# Altium PCB Smart-Switch-v1.1.PcbDoc (part 3 of 3)
Units mil, origin at the board's own origin, x right, y up, seen from the top; angles counter-clockwise.
Board outline 1456.69 x 1377.95 mil, 4 copper layers (Top Layer, Power Layer, Ground Layer, Bottom Layer), stack 39.334 mil thick; 77 components, 44 nets, 240 pads, 216 vias.
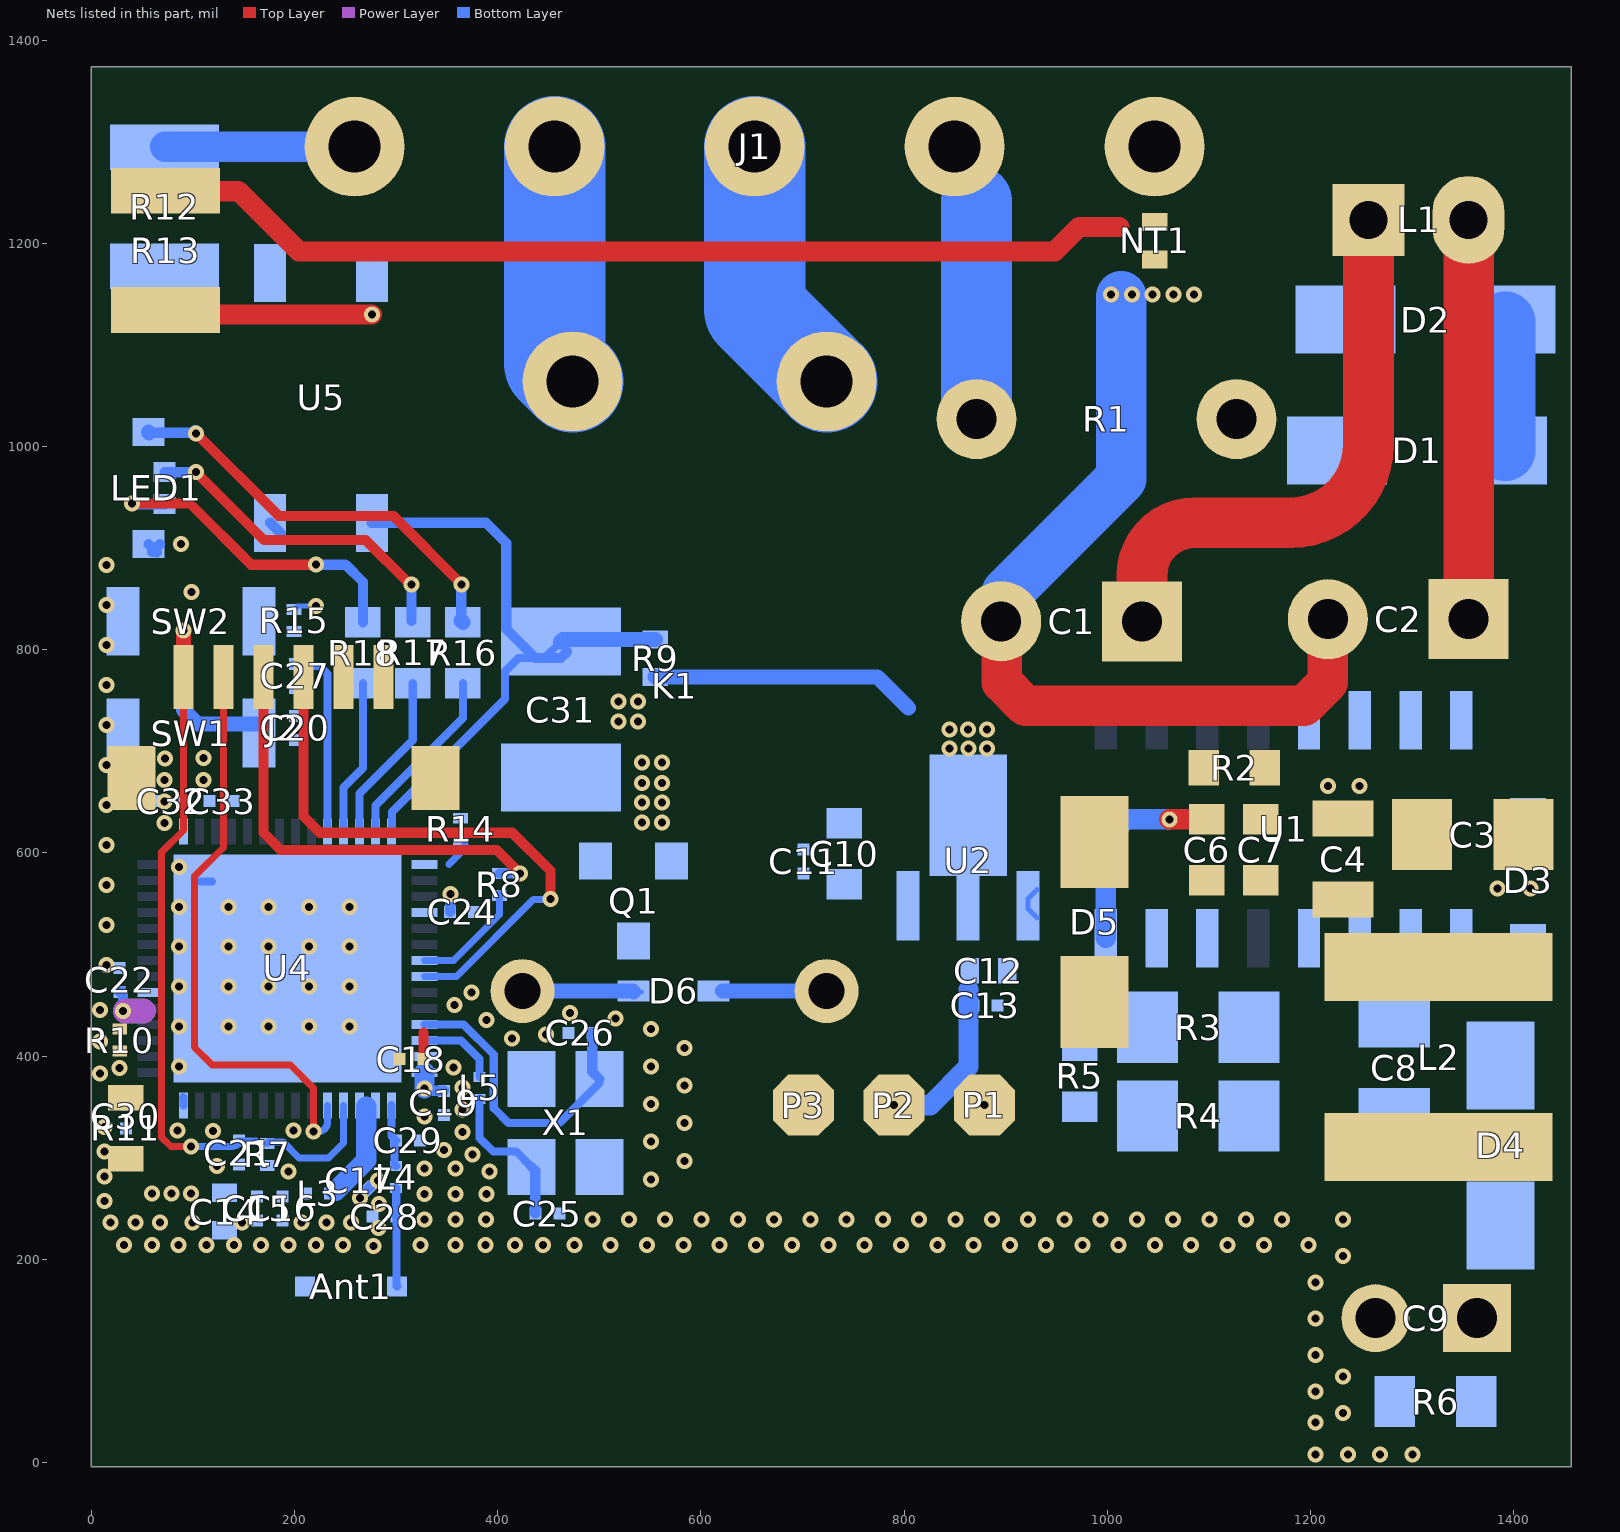
[diagram p4: the nets of this part, all layers, seen from the top]

## Via types
v1: diameter 15.75, hole 7.87, Top Layer to Bottom Layer, tented both sides, 216 vias

## Nets (pads, with @x,y where several pads share a name; then routed paths per layer and width w, separated by ;. In a path a pad name is that pad's centre, name@x,y a point inside that pad or via, vN(x,y) a via of type N, cw(c..) or ccw(c..) an arc to the next point about the centre after c; other vN are vias at no path point)
3V3: C12.2 C13.2 C14.2 C15.2 C16.2 C18.2 C19.2 C22.2 C24.2 J2.1 L3.1 LED1.1 P2.1 R7.2 R10.1 R15.2 U2.2 U4.20 U4.46 U4.55 U4.56 U5.4 | length 344.7
  Top Layer w10: C18.2@326.86,397 326.86,423.17
  Power Layer w25: v1@33.54,444.38 51.21,444.38
  Bottom Layer w5: R15.2@199.45,839.45 202.85,842.85 v1(221.19,842.85)
  Bottom Layer w10: C22.2@27.84,463.35 29.99,463.35 31.26,462.07 v1(31.26,444.38) ; LED1.1@56.13,903.88 LED1.1@61.78,898.23 ; LED1.1@59.85,896.29 LED1.1@61.78,898.23 ; LED1.1@64.26,895.74 LED1.1@61.78,898.23 ; LED1.1@67.44,903.88 LED1.1@61.78,898.23 ; U5.4@176,924.97 U5.4@186.75,914.22 ; v1(327.95,368.35) 329.5,368.35 331.96,365.9 C19.2@347.04,365.9 ; C24.2@353.01,542.03 353.25,542.27 353.25,559.47 v1(353.49,559.71)
  Bottom Layer w20: U4.56@327.84,384 327.95,383.9 v1(327.95,368.35) ; v1(789.84,351.74) 825.61,351.74 863.28,389.41 863.28,465.28
  other v1: 59.41,264.94 78.68,264.94 97.95,264.94 844.73,702.82 863.12,702.82 881.51,702.82 844.55,721.66 862.94,721.66 881.33,721.66 519,729.23 538,729.23 519,749 538,749 88.28,903.88
5V: C9.1 C10.2 C11.2 D4.2 D6.2 K1.1 L2.2 P1.1 R6.2 U2.3 | length 103.6
  Bottom Layer w5: D6.2@620.37,463.15 D6.2@621.22,464
  Bottom Layer w15: D6.2@621.22,464 K1.1@723.61,464
  other v1: 879,351.74
BUTTON_1: C27.2 R15.1 SW2.2 U4.38 | length 191
  Bottom Layer w8: C27.2@200.45,785.95 202.45,783.95 224.65,783.95 232.37,776.23 U4.38@232.37,621.21
C_GND: C3.1 C4.1 C6.1 C7.1 C8.1 D5.1 L2.1 R3.1 U1.1 U1.2 U1.4 U1.6
  other v1: 1384,565.15 1416.47,565.15
EN: C20.2 C21.2 J2.6 R7.1 SW1.2 U4.4 | length 896.6
  Top Layer w7: J2.6@90.64,773.02 90.64,622.2 69.12,600.68 69.12,320.2 78.22,311.09 v1(98,311.09)
  Top Layer w15: J2.6@90.64,773.02 v1(90.64,819)
  Bottom Layer w7: v1(98,311.09) 98.15,310.94 139.25,310.94 140.41,312.11 142.81,312.11 144.52,313.81 144.52,316.21 161.96,316.21 ; R7.1@173,313.92 174.82,315.74 174.9,315.66 188.43,315.66 204.32,299.77 233.52,299.77 248.12,314.37 U4.4@248.12,351.52
  Bottom Layer w15: v1(90.64,819) 90.64,740.58 104.32,726.91 SW1.2@169.49,726.91
FB: R3.2 R5.1 U1.7
GND: Ant1.GND C1.2 C2.2 C9.2 C10.1 C11.1 C12.1 C13.1 C14.1 C15.1 C16.1 C17.1 C18.1 C19.1 C20.1 C21.1 C22.1 C24.1 C25.1 C26.1 C27.1 C28.1 C29.1 C30.1 C31.2 C32.1 C33.1 D5.2 J2.2 J2.MP1 J2.MP2 NT1.2 P3.1 Q1.2 R6.1 R9.1 R11.1 R14.2 SW1.1 SW2.1 U2.1 U4.57 X1.2 X1.4 | length 1176.7
  Top Layer w5: J2.MP2@25.91,660.06 J2.MP2@39.46,673.61
  Top Layer w40: C1.2@895.42,828 896.1,827.32 896.1,768.15 919.53,744.72 1193.57,744.72 1217,768.15 C2.2@1217,830
  Bottom Layer w5: U2.1@930.92,536 922,544.92 U2.1@922,548 922,555.08 U2.1@930.92,564
  Bottom Layer w8: U4.57@107.4,571.96 U4.57@118.77,571.96
  Bottom Layer w10: v1(264.19,260.34) 264.19,261.6 275.83,273.23 C17.1@275.83,273.34
  Bottom Layer w15: R9.1@554.89,773.14 773.6,773.14 804.13,742.61
  Bottom Layer w50: C1.2@895.42,828 900.92,833.5 900.92,855.92 1013.67,968.67 1013.67,1147.8
  other v1: 1205,7.72 1236.71,7.72 1268.43,7.72 1300.14,7.72 1205,39.44 1232.12,48.82 1205,70.15 1232.12,84.53 1205,105.86 1205,141.57 1205,177.29 1232.12,203.32 277.73,213 32.21,214 59.53,214 85.85,214 113.05,214 140.37,214 166.69,214 193.89,214 221.21,214 247.53,214 324,214 358.28,214 387.99,214 416.88,214 444.7,214 475.42,214 511.13,214 546.84,214 582.55,214 618.27,214 653.98,214 689.69,214 725.41,214 761.12,214 796.83,214 832.54,214 868.26,214 903.97,214 939.68,214 975.39,214 1011.11,214 1046.82,214 1082.53,214 1118.25,214 1153.96,214 1198,214 282.52,231.01 18.88,236.09 43.21,236.09 67.53,236.09 99.73,236.09 148.37,236.09 206.89,236.09 231.21,236.09 255.53,236.09 328,239.09 358.28,239.09 388.39,239.09 493.39,239.09 529.1,239.09 564.81,239.09 600.52,239.09 636.24,239.09 671.95,239.09 707.66,239.09 743.38,239.09 779.09,239.09 814.8,239.09 850.51,239.09 886.23,239.09 921.94,239.09 957.65,239.09 993.37,239.09 1029.08,239.09 1064.79,239.09 1100.5,239.09 1136.22,239.09 1171.93,239.09 1232.12,239.03 283.26,254.7 12.84,257.35 328,264.19 358.28,264.19 388.79,264.19 281.97,277.49 550.77,278.68 12.84,281.67 193.84,286.5 391.83,286.28 328,289.28 358.28,289.28 123.72,291.72 583.83,296.9 375.17,302.95 12.84,305.99 346.89,307.68 550.77,315.73 365.19,325.53 119.55,326.32 84.87,326.77 198.97,326.85 12.84,330.31 583.83,333.96 328,340.56 365.19,347.66 550.77,352.79 365.41,369.26 583.83,371.02 8.57,382.95 86,389.67 356.53,388.73 550.77,389.85 583.83,408.07 8.57,414.28 413.93,417.5 447.51,421.51 550.77,426.91 86,429 134.73,429 174.46,429 214.19,429 253.92,429 388.9,435.58 515.8,436.91 471.15,442.66 8.57,445.6 357.44,450.47 374,462.74 86,468.33 134.73,468.33 174.46,468.33 214.19,468.33 253.92,468.33 14.93,489.91 86,507.67 134.73,507.67 174.46,507.67 214.19,507.67 253.92,507.67 14.93,529.24 86,547 134.73,547 174.46,547 214.19,547 253.92,547 14.93,568.57 86,586.33 14.93,607.91 71.95,629.38 542,629.93 561.73,629.93 14.93,647.24 542,649.7 561.73,649.7 72.06,650.62 542,669 561.73,669 72.17,671.86 110.17,672 14.93,686.57 542,688.77 561.73,688.77 72.28,693.09 110.28,693.24 14.93,725.91 14.93,765.24 14.93,804.57 14.93,843.91 98.3,856.9 14.93,883.24 1003.68,1149.8 1024.08,1149.8 1044.48,1149.8 1064.88,1149.8 1085.28,1149.8
I: J1.3 K1.4 | length 260.5
  Bottom Layer w100: J1.3@652.78,1295.19 652.78,1134.83 K1.4@723.61,1064
IO0: J2.5 U4.5 | length 587.9
  Top Layer w7: J2.5@130.01,773.02 130.01,605.47 101.59,577.05 101.59,408.46 118.95,391.1 196.03,391.1 218.7,368.43 v1(218.7,326.01)
  Bottom Layer w7: v1(218.7,326.01) 223.74,326.01 ccw(c223.74,334.64) 232.37,334.64 U4.5@232.37,351.52
IO4_: Q1.1 R14.1 U4.43 | length 26.7
  Bottom Layer w7: 351.8,588.72 367.64,604.56 367.64,608.56 R14.1@367.89,608.81
IO6_: C31.1 R9.2 U4.42 U5.3 | length 652.8
  Bottom Layer w8: U4.42@295.36,621.21 295.69,621.54 295.69,640.17 406.94,751.43 406.94,778.41 420.41,791.87 C31.1@434.69,791.87 ; C31.1@446,791.87 C31.1@462,807.87
  Bottom Layer w10: U5.3@276,924.97 388.41,924.97 408.38,905 408.38,820.34 436.85,791.87 446,791.87 462,791.87 C31.1@468.27,798.14
  Bottom Layer w15: C31.1@462,807.87 464.27,810.14 R9.2@554.89,810.14
LED_B: R18.2 U4.39 | length 153.7
  Bottom Layer w8: U4.39@248.12,621.21 248.12,664.5 267.25,683.64 R18.2@267.25,767.02
LED_G: R17.2 U4.40 | length 167.6
  Bottom Layer w8: U4.40@263.87,621.21 263.87,658.61 316.35,711.09 R17.2@316.35,767.02
LED_R: R16.2 U4.41 | length 181.5
  Bottom Layer w8: U4.41@279.62,621.21 279.62,646.55 365.7,732.63 R16.2@365.7,767.02
LIVE: J1.2 R1.2 | length 227.8
  Bottom Layer w50: J1.2@849.63,1295.19 J1.2@858.9,1285.92
  Bottom Layer w70: R1.2@871.09,1027 871.09,1241.69
NetAnt1_ANT#: Ant1.ANT# C28.2 L4.1 | length 97.9
  Bottom Layer w8.19: C28.2@299.35,242.12 300,242.77 L4.1@300,270.17 ; C28.2@300,242.47 300.35,242.12 300.35,174.79 ccw(c302.56,174.79) Ant1.ANT#@301,173.23
NetC1_1: C1.1 D2.1 L1.1 | length 563.7
  Top Layer w50: C1.1@1034,828 1034,873.2 cw(c1085.8,873.2) 1085.8,925 1180,925 ccw(c1180,1002) 1257,1002 L1.1@1257,1223 L1.1@1257,1224
NetC2_1: C2.1 L1.2 U1.13 U1.14 U1.15 U1.16 | length 393.8
  Top Layer w50: C2.1@1355.58,830 L1.2@1355.58,1223.84
NetC6_2: C6.2 R2.1 U1.8 | length 204.5
  Top Layer w20: v1(1061,633) C6.2@1098,633
  Bottom Layer w20: U1.8@998.43,516.2 998.43,612.77 1018.66,633 v1(1061,633)
NetC7_2: C7.2 R2.2
NetC8_2: C8.2 D3.1 D4.1 R4.2
NetC17_2: C17.2 L3.2 U4.2 U4.3 | length 95
  Bottom Layer w20: 240.55,267.63 270.45,297.53 270.45,350.23
NetC29_2: C29.2 L4.2 U4.1 | length 62.8
  Bottom Layer w8.19: U4.1@295.36,351.52 295.36,321.64 C29.2@300,317 ; C29.2@298.36,317 298.36,292.65 299.18,291.83 L4.2@300,291.83
NetC32_2: C32.2 C33.2 U4.29
NetD1_1: D1.1 D2.2 | length 130.5
  Bottom Layer w50: D2.2@1389,1125 cw(c1389,1122.42) D2.2@1391.58,1122.42
  Bottom Layer w60: D1.1@1391.58,996 D2.2@1391.58,1122.42
NetD1_2: D1.2 R1.1
NetD6_1: D6.1 K1.2 Q1.3 | length 117.6
  Bottom Layer w5: D6.1@533.63,463.15 D6.1@541.63,463.15
  Bottom Layer w15: K1.2@424.39,464 532.78,464 D6.1@533.63,463.15
NetL5_1: L5.1 U4.54 | length 79.4
  Bottom Layer w8: U4.54@327.84,415.5 363.83,415.5 382,397.33 L5.1@382,379.65
NetLED1_2: LED1.2 R18.1 | length 330
  Top Layer w10: v1(40,944) 97,944 157.32,883.68 v1(220.91,883.68)
  Bottom Layer w10: v1@40.75,943.25 LED1.2@71.87,943.25 ; v1(220.91,883.68) 250.19,883.68 267.25,866.62 R18.1@267.25,827.02
NetLED1_3: LED1.3 R17.1 | length 321.8
  Top Layer w10: v1(102.99,974.75) 169.87,907.87 270.17,907.87 v1@311.36,866.67
  Bottom Layer w5: R17.1@315.09,828.27 R17.1@316.35,827.02
  Bottom Layer w10: LED1.3@71.87,974.75 v1(102.99,974.75) ; R17.1@315.09,828.27 v1(315.09,864)
NetLED1_4: LED1.4 R16.1 | length 408.2
  Top Layer w10: v1(103,1013) 184.26,931.74 297.07,931.74 364.09,864.71 v1(364.09,864)
  Bottom Layer w10: LED1.4@56.69,1013.56 v1@102.44,1013.56 ; R16.1@364.09,828.63 v1(364.09,864)
  Bottom Layer w15: LED1.4@56.13,1014.12 LED1.4@56.69,1013.56 ; v1@102.44,1013.56 v1(103,1013) ; R16.1@364.09,828.63 R16.1@365.7,827.02
NetR4_1: R4.1 R5.2
NetR8_1: R8.1 U4.49 | length 113.1
  Bottom Layer w7: U4.49@327.84,494.24 356.53,494.24 401.64,539.35 R8.1@401.64,559.99
NetR12_2: R12.2 U5.1
NetR13_2: R13.2 U5.2 | length 174
  Top Layer w20: R13.2@102,1130 v1(276,1130)
NEUTRAL: J1.1 NT1.1 R13.1 | length 1046.6
  Top Layer w5: J1.1@1029.23,1252.03 1036.68,1259.48 1046.48,1259.48 J1.1@1046.48,1295.19
  Top Layer w20: R13.1@73,1251.66 73.49,1251.17 144.83,1251.17 204,1192 948.05,1192 972.05,1216 1011.68,1216 ; J1.1@1028.7,1277.43 J1.1@1045.93,1277.43
NTC_TEMP: C30.2 R10.2 R11.2 U4.14 | length 8.2
  Bottom Layer w8: U4.14@90.31,359.54 90.64,359.21 U4.14@90.64,351.52
  other v1: 27.84,388.33
O: J1.4 K1.3 | length 238.5
  Bottom Layer w100: J1.4@455.93,1295.19 455.93,1081.68 K1.3@473.61,1064
RXD: J2.3 U4.50 | length 585.6
  Top Layer w10: J2.3@208.75,773.02 208.75,635.98 224.84,619.89 414.34,619.89 451.83,582.41 v1(451.83,554.73)
  Bottom Layer w7: U4.50@327.84,478.49 359.41,478.49 434.96,554.04 451.14,554.04 v1(451.83,554.73)
SWITCH: J1.5 R12.1 | length 187.3
  Bottom Layer w5: R12.1@72,1294.66 R12.1@72.53,1295.19
  Bottom Layer w30: R12.1@72.53,1295.19 J1.5@259.08,1295.19
TXD: J2.4 R8.2 | length 442.6
  Top Layer w10: J2.4@169.49,772.91 169.49,619.68 186.27,602.89 398.93,602.89 v1(422,579.83)
  Bottom Layer w10: R8.2@401.64,579.83 v1(422,579.83)
VCC: C3.2 C4.2 D3.2 U1.3
  other v1: 1217,666 1248,666
XTAL_IN: C25.2 L5.2 X1.1 | length 149
  Bottom Layer w8: L5.2@382,358 382,319.59 395.51,306.08 418.12,306.08 X1.1@433.25,290.95
  Bottom Layer w10: X1.1@433.25,290.95 436.91,287.29 C25.2@436.91,245
XTAL_OUT: C26.2 U4.53 X1.3 | length 312.2
  Bottom Layer w8: U4.53@327.84,431.24 366.42,431.24 396,401.66 396,348.75 410.5,334.25 460.8,334.25 480.55,354 500.18,373.62 X1.3@500.18,377.56
  Bottom Layer w10: C26.2@493.04,423 493.04,384.7 X1.3@500.18,377.56
pads on no net: U1.5 U1.9 U1.10 U1.11 U1.12 U4.6 U4.7 U4.8 U4.9 U4.10 U4.11 U4.12 U4.13 U4.15 U4.16 U4.17 U4.18 U4.19 U4.21 U4.22 U4.23 U4.24 U4.25 U4.26 U4.27 U4.28 U4.30 U4.31 U4.32 U4.33 U4.34 U4.35 U4.36 U4.37 U4.44 U4.45 U4.47 U4.48 U4.51 U4.52

## Polygon pours and split planes (outlines as drawn)
3V3 on Power Layer "3V3_L02_P004" (solid, remove dead copper, pour order 4): 79.59,350.28 106.31,350.28 114.62,358.59 114.62,697.57 126.9,709.85 313.25,709.85 327.7,695.4 327.7,534.33 334.18,527.85 387.2,527.85 393.77,534.42 393.77,692.22 411.41,709.85 677.16,709.85 726.43,660.59 907.81,660.59 919,671.77 919,740.45 907.81,751.64 826.98,751.64 768.48,810.14 311.12,810.14 264.37,856.9 168.53,856.9 160,865.43 160,910.77 150.77,920 45.36,920 45.36,371.41 33.23,359.28 33.23,256.31 38.2,251.34 45.36,251.34 107.76,251.34 107.76,285.47 77.75,285.47 69.94,293.27 69.94,340.63
GND on Power Layer "GND_L02_P005" (solid, remove dead copper, pour order 5): 1106.08,754.54 1121.1,769.57 1121.1,859.97 1134.92,873.78 1258.59,873.78 1271.72,860.65 1271.72,769.52 1286.69,754.55 1431.45,754.55 1456.69,729.31 1456.69,-3.98 1190.58,-3.98 1190.58,201 0,201 0,1046.22 278.78,1046.22 293,1032 293,913 309.72,896.28 935.36,896.28 946.72,884.92 946.72,769.57 961.74,754.54
5V on Power Layer "5V_L02_P003" (solid, pour order 3): 664.81,333.25 677.39,320.67 677.75,320.67 1301.88,320.67 1319,303.56 1319,10 1456.69,10 1456.69,482.29 1428.98,510.01 680.19,510.01 664.81,494.62
GND on Bottom Layer "GND_L04_P000" (solid, pour order 0): 935.86,290.71 1319,290.71 1319,-3.98 1190.86,-3.98 1190.86,201 0,201 0,896.28 935.86,896.28
GND on Ground Layer "GND_L03_P002" (solid, remove dead copper, pour order 2): 1106.36,754.27 1121.38,769.29 1121.38,860.24 1134.92,873.78 1253.06,873.78 1272,854.84 1272,769.24 1286.97,754.27 1431.73,754.27 1456.69,729.31 1456.69,-3.98 1190.86,-3.98 1190.86,201 0,201 0,1045.94 279.06,1045.94 293.28,1031.72 293.28,912.72 310,896 935.64,896 947,884.64 947,769.29 962.02,754.27
GND on Top Layer "GND_L01_P001" (solid, remove dead copper, pour order 1): 1456.69,356 1201,356 1201,266.52 1319.15,266.52 1319.15,-3.98 1190.86,-3.98 1190.86,201 0,201 0,896.28 952,896.28 952,754.54 933.7,754.54 933.42,754.27 933.42,389.47 1456.69,389.47

## Other copper
Top Layer:
  rectangle net 5V: 1330.44,-3.98 1456.69,344.42
  rectangle net 3V3: 319.01,542.03 374,571.61
  rectangle net 3V3: 315.44,358.37 340.44,571.61
  rectangle net NEUTRAL: 992.68,1208.8 1099.18,1346.07
  rectangle net GND: 992.68,1127.54 1099.18,1193
  rectangle net NTC_TEMP: 20.56,349.55 35.13,410.32
  rectangle net 3V3: 20.72,421.34 41.67,452.61
  rectangle net 3V3: 277.65,714.49 556.96,764
  rectangle net GND: 919,514.08 1020.9,744.72
  rectangle net C_GND: 1232,492.44 1411.92,562.11
  rectangle net C_GND: 953.97,407.96 1438.96,498.51
  rectangle net C_GND: 1147.21,487.43 1262,588
  rectangle net C_GND: 1359.76,407.96 1456.69,700.48
  rectangle net VCC: 1190.49,616.28 1338.96,700.48
  rectangle net NetC7_2: 1133.5,618 1170,701.5
  rectangle net NetC6_2: 1045.72,618 1115.5,701.5
  rectangle net C_GND: 1047.14,413.46 1168.5,588
  rectangle net GND: 119,413 269,563
  region net 3V3: 373.83,542.03 ccw(c374,508.4) 340.37,508.4 340.37,498.05 319.96,498.57 320.54,552.9 373.83,551.81
Bottom Layer:
  rectangle net NetC29_2: 290.81,311.09 305.91,322.91
  rectangle net 3V3: 165.72,270.93 180.28,292.27
  rectangle net EN: 139.31,308.61 184.61,323.81
  rectangle net 3V3: 48.95,255.93 217.09,273.91
  rectangle net NetC17_2: 228.91,255.93 246.78,273.91
  rectangle net IO4_: 315.05,584.39 367.98,593.06
  rectangle net 3V3: 315.05,537.15 349.34,547.15
  region net NTC_TEMP: 33.75,388.33 21.94,388.33 21.94,357.16 33.75,357.16
  rectangle net NetC32_2: 84.71,645.09 122.09,656.95
  rectangle net BUTTON_1: 148.79,779.84 206.73,823.11
  rectangle net EN: 148.79,684.14 206.35,718
  rectangle net NetC32_2: 86.31,608.41 94.97,656.95
  rectangle net IO4_: 364.14,609.85 512.37,620.69
  rectangle net 3V3: 21.94,458.41 70.95,467.07
  rectangle net GND: 988.75,1129 1099,1173.36
  rectangle net NTC_TEMP: 21.94,346.63 94.97,364.32
  rectangle net 3V3: 192.17,834.14 220.79,851.62
  rectangle net 3V3: 824.89,577.53 901,730.75
  rectangle net 5V: 1330.44,-3.98 1456.69,290.71
  rectangle net LIVE: 783.94,1231.73 913,1347.41
  rectangle net GND: 194.54,728.91 206.35,768.24
  rectangle net NetR13_2: 260.25,1113.21 291.75,1199.57
  rectangle net NetC8_2: 1383.22,336.08 1438.39,529.84
  rectangle net C_GND: 1187.43,446.51 1209.43,544.97
  rectangle net FB: 955.1,393.47 1069.43,463.47
  rectangle net C_GND: 1087.43,393.47 1329.08,468.47
  rectangle net C_GND: 1087.43,393.47 1109.43,544.97
  rectangle net FB: 1037.43,428.47 1059.43,544.97
  rectangle net NetD6_1: 517.49,453.91 549.77,531.52
  rectangle net NetC2_1: 1316.21,701.97 1394.95,869.37
  rectangle net NetC1_1: 1182.31,1091.54 1298.51,1259.43
  rectangle net NetD1_2: 1087.63,962.54 1275.17,1066.37
  rectangle net NetR12_2: 18.46,1142.49 191.75,1199.78
  rectangle net 3V3: 40.38,890.1 191.75,917.66
  rectangle net GND: 198.2,173.23 222.8,230.63
  rectangle net NetC17_2: 259.54,338.72 283.95,351.52
  rectangle net NetC17_2: 259.54,338.72 283.95,364.32
  rectangle net 3V3: 315.05,373.84 340.64,404.08
  rectangle net VCC: 1189.31,608.15 1437.81,680.53
  rectangle net NetC2_1: 1187.43,701.97 1359.43,759.52
  rectangle net IO4_: 480.09,574.03 512.37,613.71
  rectangle net 3V3: 851.53,443.09 874.36,516.2
  rectangle net 3V3: 859.28,443.09 871.09,496.5
  rectangle net NetC8_2: 1087.43,306 1438.39,376
  rectangle net NetR4_1: 955.1,306 1069.43,376
  rectangle net 5V: 680.78,420 815.78,585.68
  rectangle net GND: 885.51,443.05 934.87,567.21
  rectangle net C_GND: 1287.43,438.47 1329.08,583
  rectangle net VCC: 1226.87,487.43 1271,569.47
  rectangle net C_GND: 1287.43,454.12 1359.43,583
  rectangle net C_GND: 1288.35,544.97 1438.57,583
  rectangle net VCC: 1189.31,558 1271,654
  region net IO4_: 480.01,581.03 ccw(c452.8,582.76) 453.39,610.02 453.39,617.26 496.23,617.26 496.23,581.03
  region net NTC_TEMP: 37.64,364.13 37.65,361.46 30.26,361.46 30.26,369.99 33.71,369.99 33.71,368.06 ccw(c37.64,368.06)
  region net GND: 1069.9,1128.85 ccw(c1069.9,1097.61) 1038.66,1097.61 1038.66,1083.12 1013.67,1083.12 1013.67,1149.8 1069.76,1149.8 1069.76,1129.13
  region net NTC_TEMP: 82.64,347.02 82.64,349.69 90.02,349.69 90.02,341.16 86.57,341.16 86.57,343.09 ccw(c82.64,343.09)
  region net IO4_: 367.89,584.4 cw(c392.18,585.94) 391.65,610.28 391.65,620.62 348.81,620.62 348.81,584.4
  region net GND: 81.08,583.36 ccw(c61.24,583.36) 61.24,603.2 59.75,603.2 59.75,610.22 cw(c63.52,610.22) 63.52,613.98 76.03,613.98 ccw(c91.3,613.98) 91.3,598.71 95.56,598.71 95.56,596.54 cw(c81.08,596.54) 81.08,582.06
  region net GND: 289.85,598.57 ccw(c289.85,618.41) 309.69,618.41 309.69,619.89 316.71,619.89 cw(c316.71,616.13) 320.47,616.13 320.47,602.89 ccw(c320.47,587.62) 305.21,587.62 305.21,584.09 303.03,584.09 cw(c303.03,598.57) 288.55,598.57

## Silkscreen, mask and mechanical layers (free items; w line width, h text height)
Top Overlay:
  lines w5: 1266,551.41 1279.83,551.41
  text "GND" at 663,274.91 h40
  text "3V" at 767.52,275.25 h40
  text "5V" at 858.91,275.4 h40
Bottom Overlay:
  drawing of 57 lines, arcs and shapes, not listed
  text "GPIO" at 148.19,887.71 h30
  text "RESET" at 278.86,672.74 h30
  text "$" at 878.67,239.6 h40 r270
  text "$" at 327.38,176.56 h40 r270
Bottom Solder:
  lines w25: 871,1278 871.09,1027
  lines w60: 455.93,1081.68 455.93,1295.19
  lines w70: 652.78,1295.19 652.78,1134.83 723.61,1064
Dimensions:
  drawing of 295 lines, arcs and shapes, not listed
  text "Layer" at -164.42,3270 h60
  text "Name" at 245.49,3270 h60
  text "Material" at 1175.23,3270 h60
  text "Thickness" at 2035,3270 h60
  text "Constant" at 2684.84,3270 h60
  text "Board Layer Stack" at 3254.7,3270 h60
  text "Top Overlay" at 245.49,3150 h60
  text "Top Solder" at 245.49,3030 h60
  text "Solder Resist" at 1175.23,3030 h60
  text "0.010mm" at 2035,3030 h60
  text "3.8" at 2684.84,3030 h60
  text "1" at -164.42,2910 h60
  text "Top Layer" at 245.49,2910 h60
  text "0.035mm" at 2035,2910 h60
  text "Dielectric 2" at 245.49,2790 h60
  text "PP-006" at 1175.23,2790 h60
  text "0.130mm" at 2035,2790 h60
  text "4.6" at 2684.84,2790 h60
  text "2" at -164.42,2670 h60
  text "Power Layer" at 245.49,2670 h60
  text "CF-004" at 1175.23,2670 h60
  text "0.035mm" at 2035,2670 h60
  text "Dielectric 1" at 245.49,2550 h60
  text "FR-4" at 1175.23,2550 h60
  text "0.600mm" at 2035,2550 h60
  text "4.8" at 2684.84,2550 h60
  text "3" at -164.42,2430 h60
  text "Ground Layer" at 245.49,2430 h60
  text "CF-004" at 1175.23,2430 h60
  text "0.035mm" at 2035,2430 h60
  text "Dielectric 3" at 245.49,2310 h60
  text "PP-006" at 1175.23,2310 h60
  text "0.130mm" at 2035,2310 h60
  text "4.6" at 2684.84,2310 h60
  text "4" at -164.42,2190 h60
  text "Bottom Layer" at 245.49,2190 h60
  text "0.035mm" at 2035,2190 h60
  text "Bottom Solder" at 245.49,2070 h60
  text "Solder Resist" at 1175.23,2070 h60
  text "0.010mm" at 2035,2070 h60
  text "3.8" at 2684.84,2070 h60
  text "Bottom Overlay" at 245.49,1950 h60
  text "Total board thickness:" at -164.42,1830 h60
  text "1.019mm" at 2035,1830 h60
Board Outline:
  lines w5: 364.09,1027.63 364.09,1138.9 ccw(c354.09,1138.9) 354.09,1148.9 ccw(c354.09,1138.9) 344.09,1138.9 344.09,1018.83 386.92,976 518,976 768.24,976 812.04,1019.8 812.04,1138.9 ccw(c802.04,1138.9) 802.04,1148.9 ccw(c802.04,1138.9) 792.04,1138.9 792.04,1027.33 760.71,996 518,996 395.83,996 ; 364.5,1027.63 395.83,996.3 ; 0,-3.98 1456.69,-3.98 1456.69,1373.98 0,1373.98 0,-3.98 ; 16,1081 ccw(c26,1081) 26,1071 30.14,1071 308.02,1071 ccw(c308.02,1081) 318.02,1081 ccw(c308.02,1081) 308.02,1091 30.14,1091 26,1091 ccw(c26,1081) 16,1081 ; 344.15,1245.98 ccw(c354.15,1245.98) 354.15,1235.98 ccw(c354.15,1245.98) 364.15,1245.98 364.15,1343.86 364.15,1348 ccw(c354.15,1348) 354.15,1358 ccw(c354.15,1348) 344.15,1348 344.15,1343.86 344.15,1245.98 ; 541,1245.98 ccw(c551,1245.98) 551,1235.98 ccw(c551,1245.98) 561,1245.98 561,1343.86 561,1348 ccw(c551,1348) 551,1358 ccw(c551,1348) 541,1348 541,1343.86 541,1245.98 ; 737.85,1245.98 ccw(c747.85,1245.98) 747.85,1235.98 ccw(c747.85,1245.98) 757.85,1245.98 757.85,1343.86 757.85,1348 ccw(c747.85,1348) 747.85,1358 ccw(c747.85,1348) 737.85,1348 737.85,1343.86 737.85,1245.98 ; 832.06,944.63 ccw(c842.06,944.63) 842.06,934.63 910.2,934.63 954,978.43 954,1139.54 ccw(c944,1139.54) 944,1149.54 ccw(c944,1139.54) 934,1139.54 934,985.97 902.67,954.63 842.06,954.63 ccw(c842.06,944.63) 832.06,944.63 ; 934.7,1245.98 ccw(c944.7,1245.98) 944.7,1235.98 ccw(c944.7,1245.98) 954.7,1245.98 954.7,1343.86 954.7,1348 ccw(c944.7,1348) 944.7,1358 ccw(c944.7,1348) 934.7,1348 934.7,1343.86 934.7,1245.98
Drill Drawing:
  circle w10: c-136.17,3797.33 r33.33
  lines w10: -169.5,3680.67 -102.83,3680.67 -136.17,3614 -169.5,3680.67 ; -169.5,3914 -102.83,3914 -102.83,3980.67 -169.5,3980.67 -169.5,3914 ; -169.5,4080.67 -152.83,4080.67 -136.17,4064 -119.5,4080.67 -102.83,4080.67 -119.5,4097.33 -102.83,4114 -119.5,4114 -136.17,4130.67 -152.83,4114 -169.5,4114 -152.83,4097.33 -169.5,4080.67 ; -169.5,4230.67 -152.83,4230.67 -152.83,4214 -119.5,4214 -119.5,4230.67 -102.83,4230.67 -102.83,4264 -119.5,4264 -119.5,4280.67 -152.83,4280.67 -152.83,4264 -169.5,4264 -169.5,4230.67
  lines w15: -229.29,3569 6890.77,3569 ; -229.29,4319 6890.77,4319 ; 321.58,3419 321.58,4469 ; 921.43,3419 921.43,4469 ; 2021.1,3419 2021.1,4469 ; 2526.98,3419 2526.98,4469 ; 3260.78,3419 3260.78,4469 ; 4760.33,3419 4760.33,4469 ; 5350.18,3419 5350.18,4469 ; 6095.98,3419 6095.98,4469 ; -229.29,3419 6890.77,3419 6890.77,4469 -229.29,4469 -229.29,3419
  text "Symbol" at -139.29,4364 h72
  text "Count" at 366.58,4364 h72
  text "Hole Size" at 966.43,4364 h72
  text "Plated" at 2066.1,4364 h72
  text "Hole Type" at 2571.98,4364 h72
  text "Drill Layer Pair" at 3305.78,4364 h72
  text "Via/Pad" at 4805.33,4364 h72
  text "Pad Shape" at 5395.18,4364 h72
  text "Template" at 6140.98,4364 h72
  text "2" at 366.58,4214 h60
  text "35.43mil (0.900mm)" at 966.43,4214 h60
  text "PTH" at 2066.1,4214 h60
  text "Round" at 2571.98,4214 h60
  text "Top Layer - Bottom Layer" at 3305.78,4214 h60
  text "Pad" at 4805.33,4214 h60
  text "Rounded" at 5395.18,4214 h60
  text "c160h90" at 6140.98,4214 h60
  text "2" at 366.58,4064 h60
  text "37.40mil (0.950mm)" at 966.43,4064 h60
  text "PTH" at 2066.1,4064 h60
  text "Round" at 2571.98,4064 h60
  text "Top Layer - Bottom Layer" at 3305.78,4064 h60
  text "Pad" at 4805.33,4064 h60
  text "(Mixed)" at 5395.18,4064 h60
  text "(Mixed)" at 6140.98,4064 h60
  text "7" at 366.58,3914 h60
  text "51.18mil (1.300mm)" at 966.43,3914 h60
  text "PTH" at 2066.1,3914 h60
  text "Round" at 2571.98,3914 h60
  text "Top Layer - Bottom Layer" at 3305.78,3914 h60
  text "Pad" at 4805.33,3914 h60
  text "Rounded" at 5395.18,3914 h60
  text "c250h130" at 6140.98,3914 h60
  text "8" at 366.58,3764 h60
  text "39.37mil (1.000mm)" at 966.43,3764 h60
  text "PTH" at 2066.1,3764 h60
  text "Round" at 2571.98,3764 h60
  text "Top Layer - Bottom Layer" at 3305.78,3764 h60
  text "Pad" at 4805.33,3764 h60
  text "(Mixed)" at 5395.18,3764 h60
  text "(Mixed)" at 6140.98,3764 h60
  text "216" at 366.58,3614 h60
  text "7.87mil (0.200mm)" at 966.43,3614 h60
  text "PTH" at 2066.1,3614 h60
  text "Round" at 2571.98,3614 h60
  text "Top Layer - Bottom Layer" at 3305.78,3614 h60
  text "Via" at 4805.33,3614 h60
  text "Rounded" at 5395.18,3614 h60
  text "v40h20m0mx0" at 6140.98,3614 h60
  text "235 Total" at 366.58,3464 h60

## Dimensions
0,1373.98 to 1456.69,1373.98 on Dimensions
1456.69,-3.98 to 1456.69,1373.98 on Dimensions